# Altium PCB SCD2326控制板-V0.3.PcbDoc (part 1 of 2)
Units mil, origin at the board's own origin, x right, y up, seen from the top; angles counter-clockwise.
Board outline 4055.12 x 2086.61 mil, 2 copper layers (Top Layer, Bottom Layer), stack 12.8 mil thick; 202 components, 132 nets, 638 pads, 241 vias.
Unrouted connection lines stored in the file: 24.
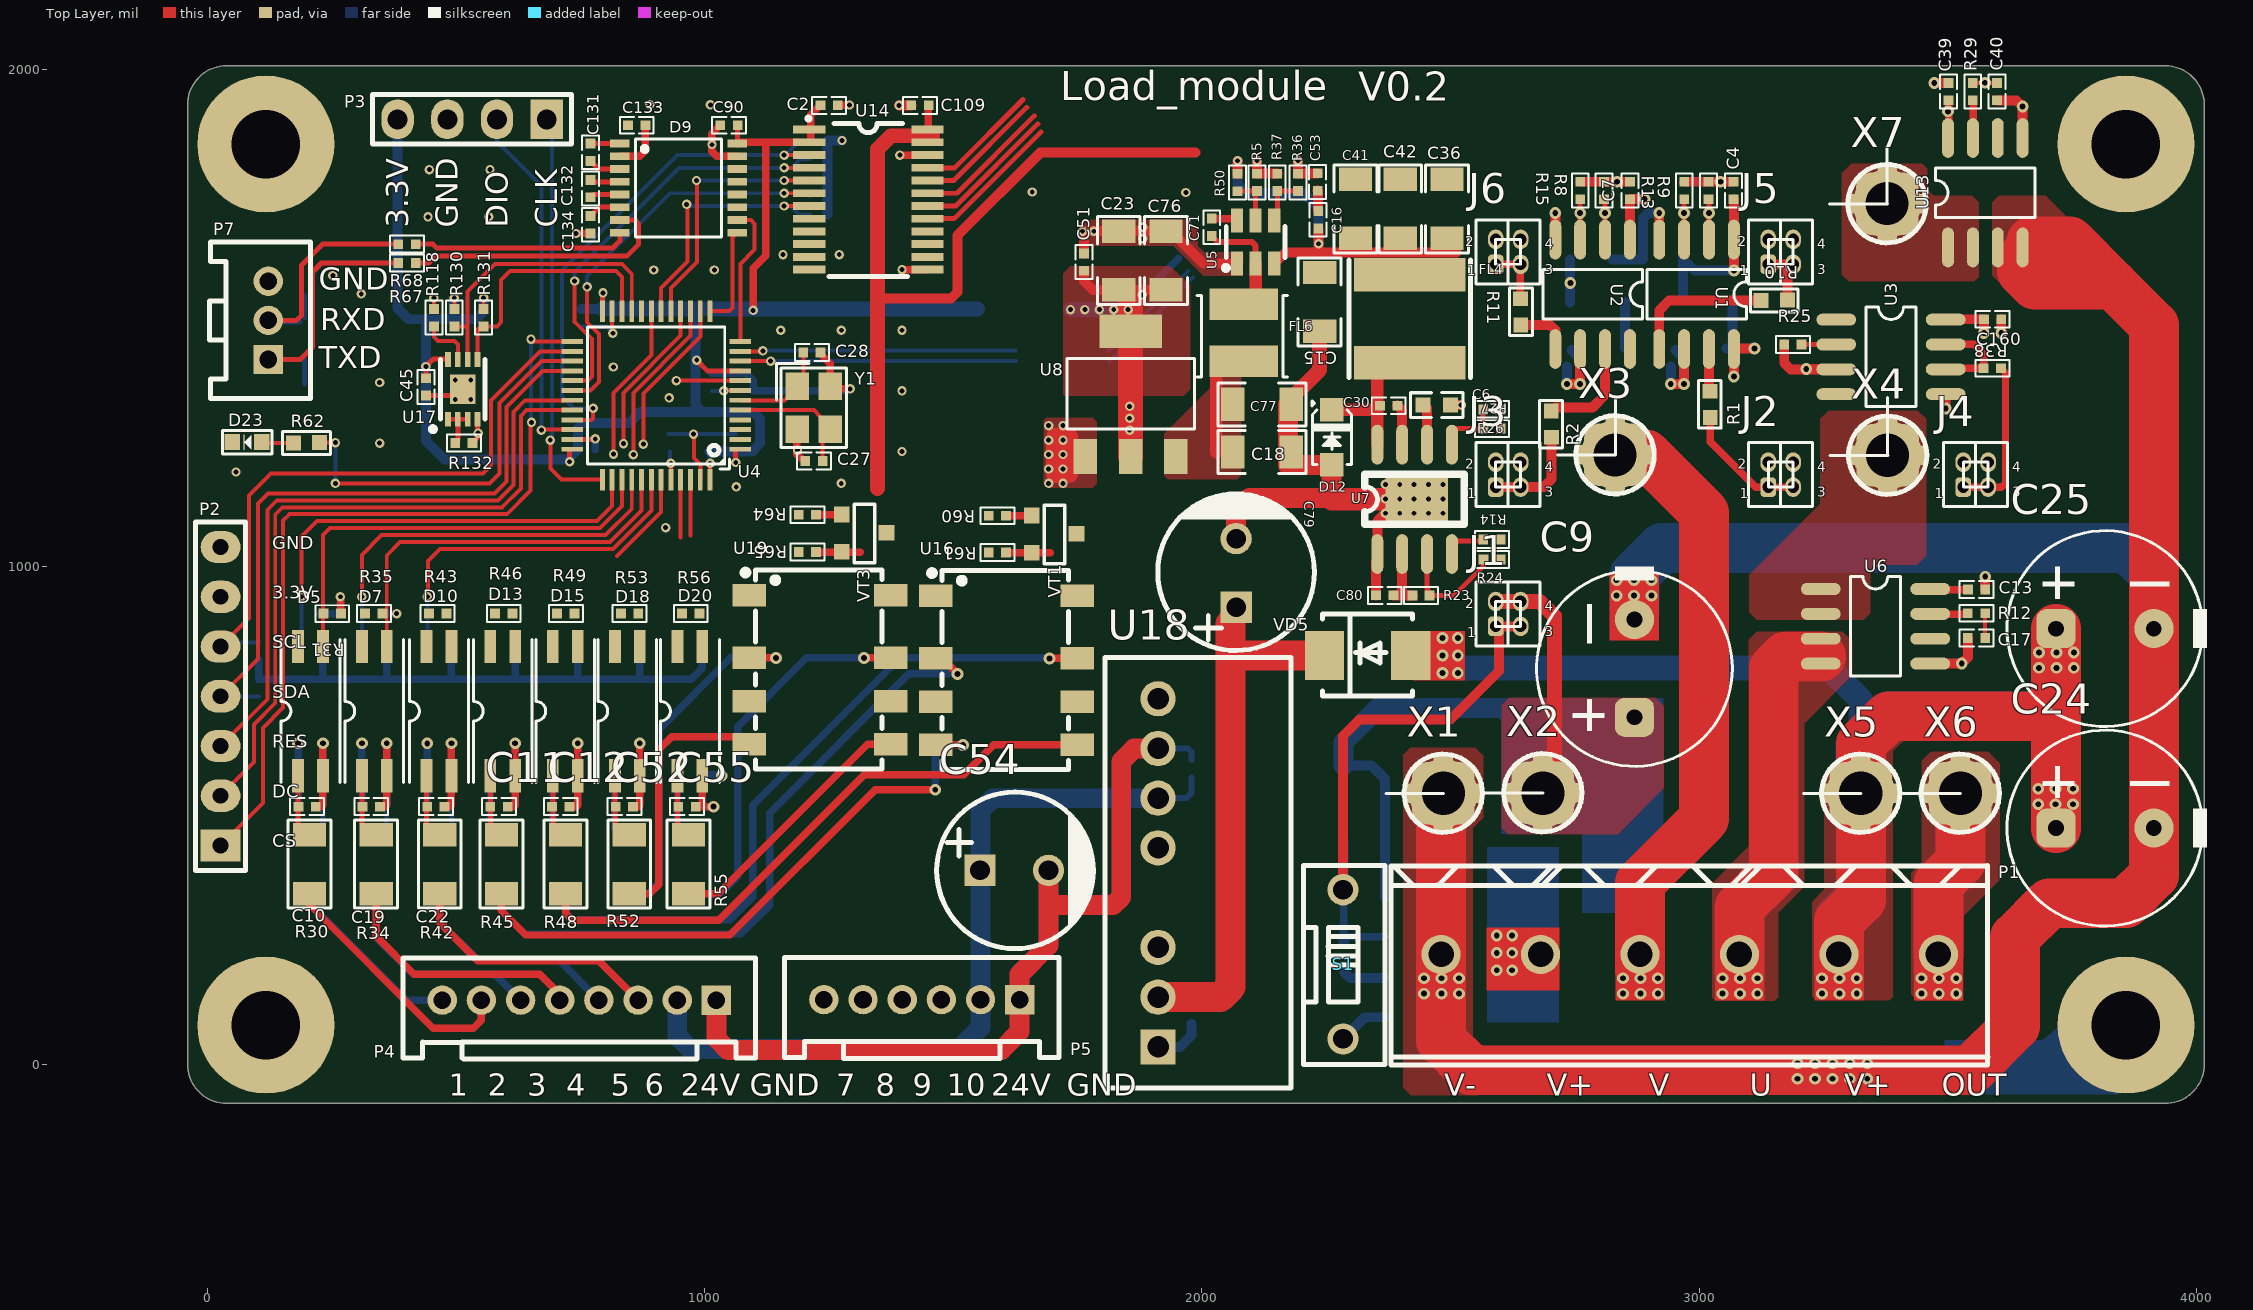
[diagram p0: Top Layer view]
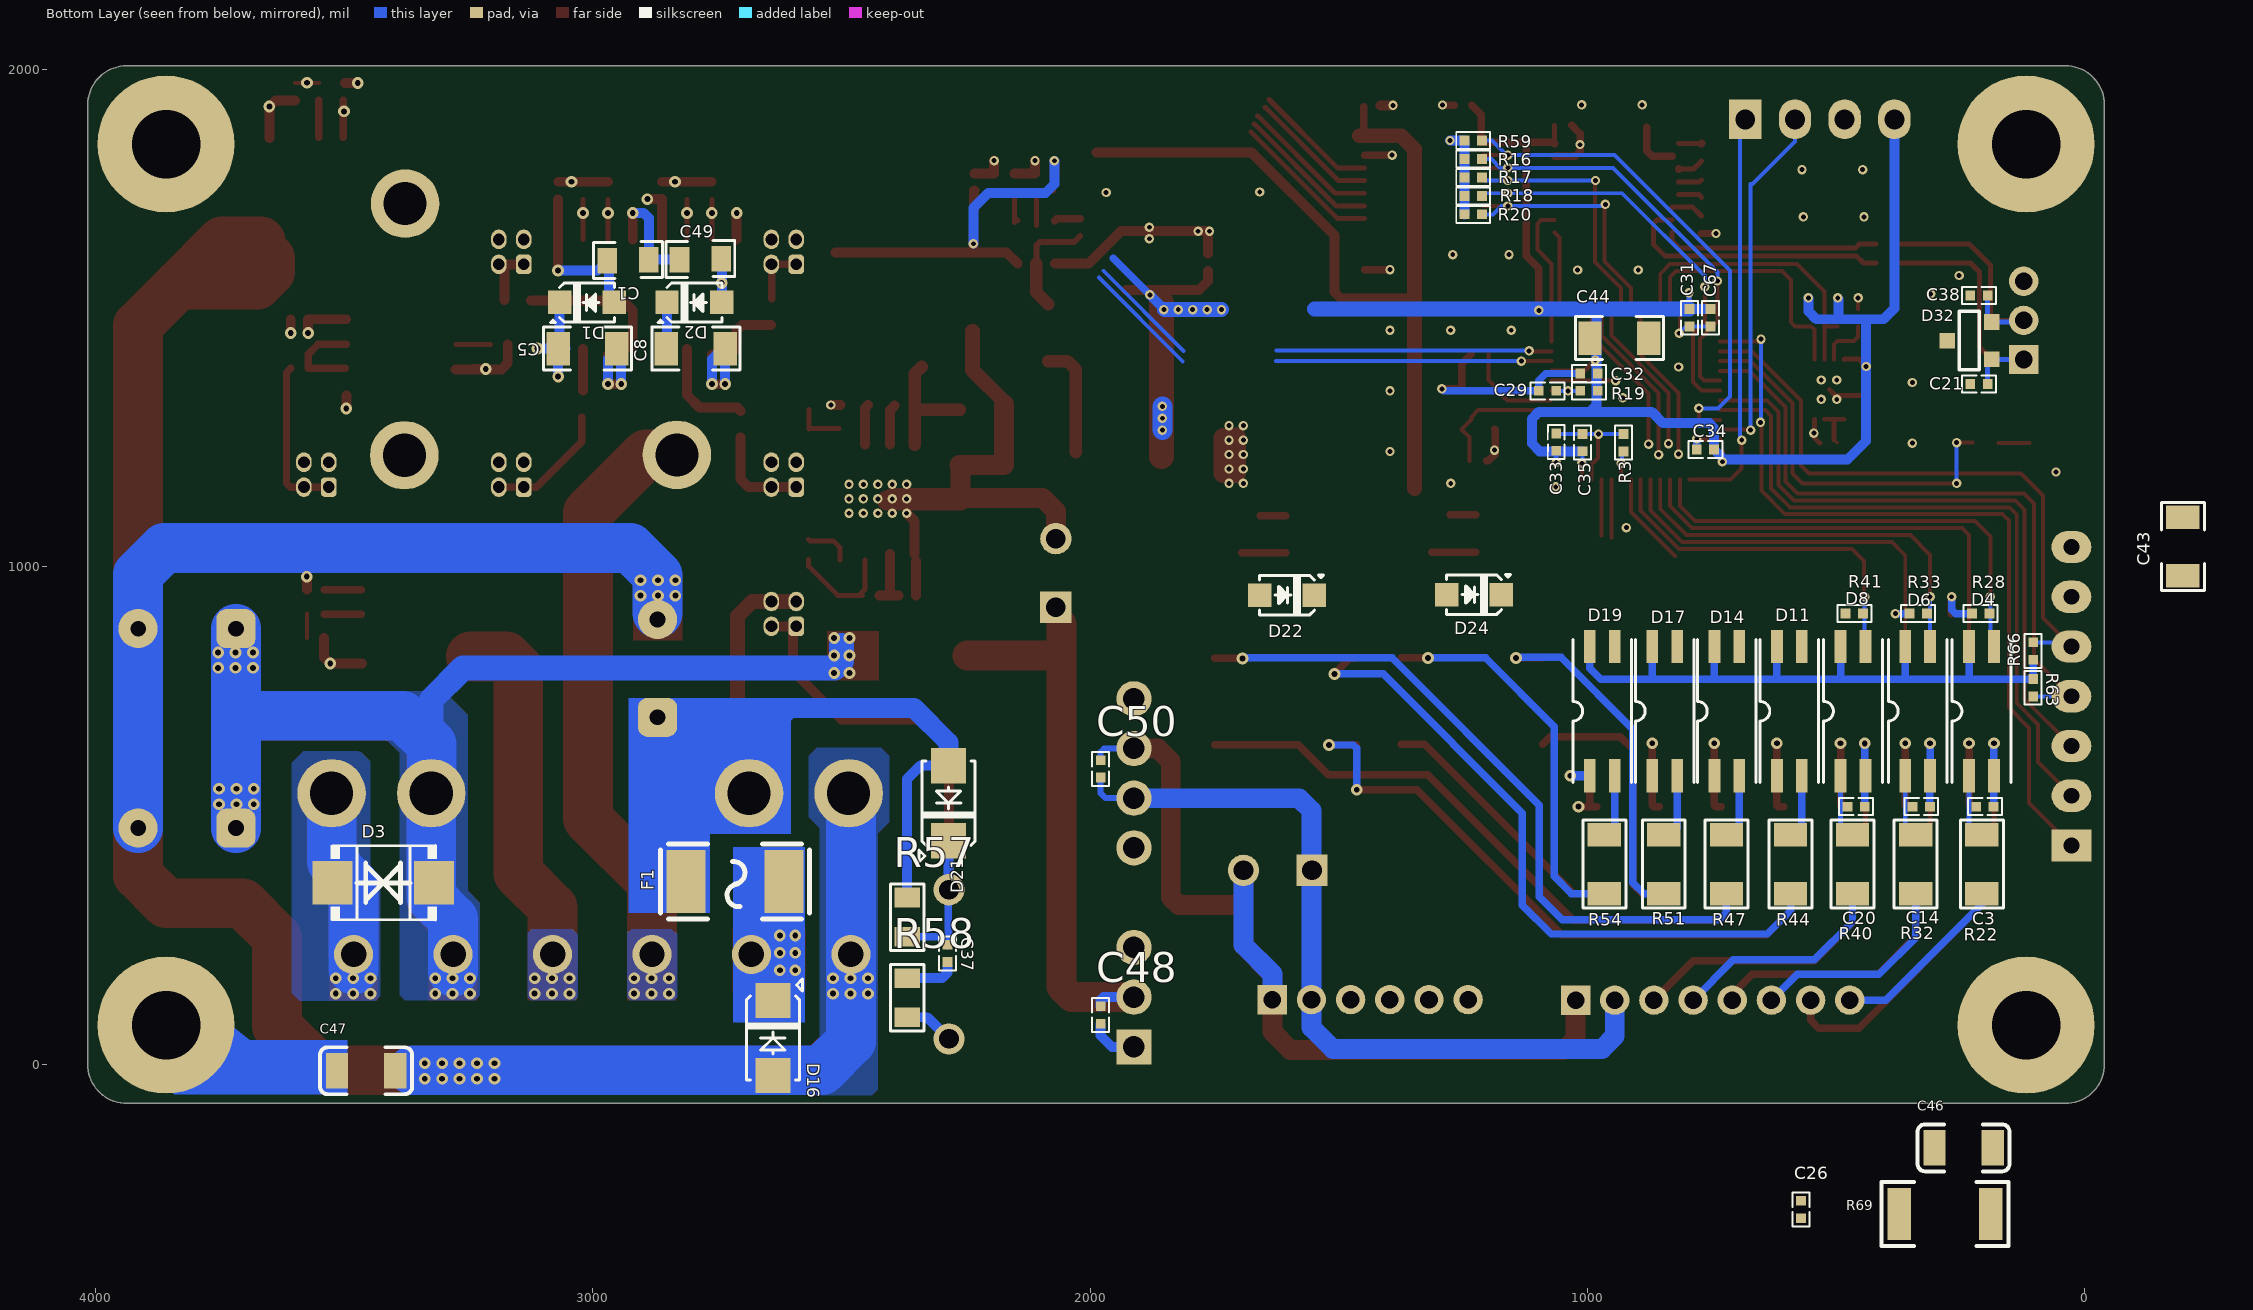
[diagram p1: Bottom Layer view, seen from below]
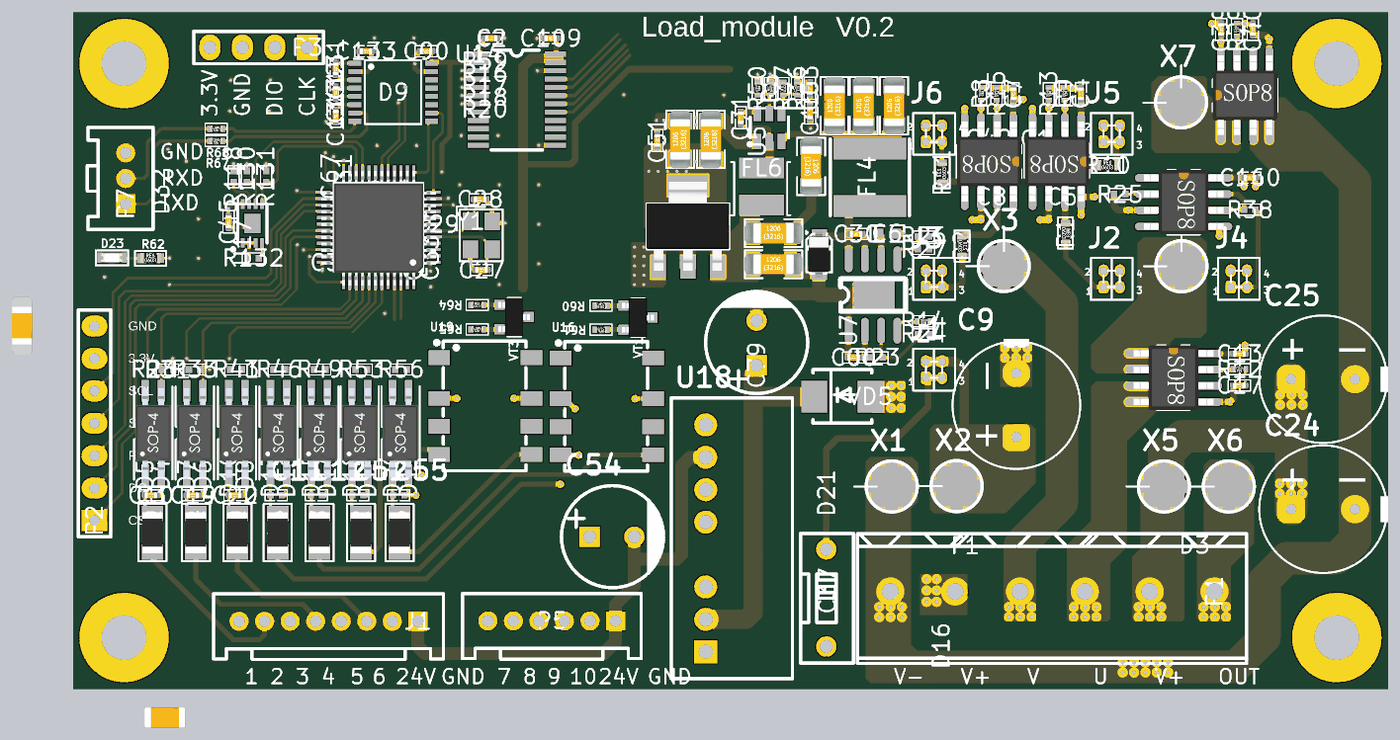
[diagram p3: 3D render of the assembled board from above, using the file's embedded part models]
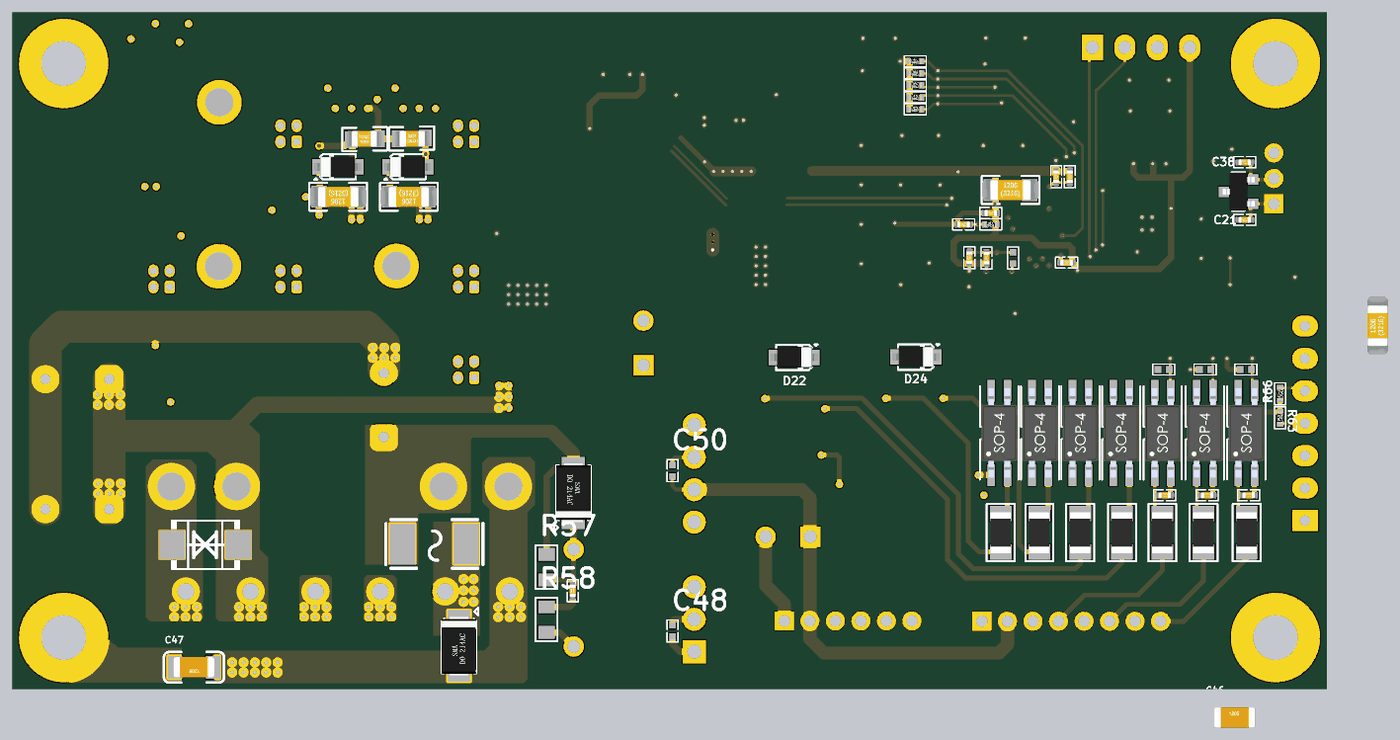
[diagram p4: 3D render of the assembled board from below, using the file's embedded part models]

## Layer stack, top to bottom
Top Solder: solder mask 0.4, Solder Resist, Dk 3.5
Top Layer: signal copper 1.4
Dielectric 1: core 10, PP-006, Dk 4.2
Bottom Layer: signal copper 1.4
Bottom Solder: solder mask 0.4, Solder Resist, Dk 3.5

## Board outline
-39.37,0 -39.37,1929.13 cw(c39.37,1929.13) 39.37,2007.87 3937.01,2007.87 cw(c3937.01,1929.13) 4015.75,1929.13 4015.75,0 cw(c3937.01,0) 3937.01,-78.74 39.37,-78.74 cw(c39.37,0)

## Design rules (kind name [scope] priority, off if disabled: settings)
Clearance [All] p1: gap=5.98
HoleSize [All] p1 off: absolutevalues=TRUE maxlimit=100 minlimit=1 maxpercent=80.000 minpercent=20.000
HoleToHoleClearance [All] p1 off: gap=10 allowstackedmicrovias=TRUE
LayerPairs [All] p1 off: enforce=TRUE
MinimumSolderMaskSliver [All] p1 off: minsoldermaskwidth=10
PlaneConnect [All] p1: planeconnectstyle=Direct reliefexpansion=20 reliefentries=4 reliefconductorwidth=10 reliefairgap=10
PolygonConnect [All] p1: connectstyle=Direct reliefconductorwidth=10 reliefentries=4 polygonreliefangle="90 Angle" airgapwidth=10
RoutingVias [All] p1: holewidth=28 width=50 viastyle="Through Hole" minholewidth=9.84 minwidth=17.72 maxholewidth=28 maxwidth=50
SilkToBoardRegionClearance [All] p1 off:
SilkToSilkClearance [All] p1 off: silktosilkclearance=10
SilkToSolderMaskClearance [IsPad] p1 off: minsilkscreentomaskgap=10 clearancetoexposedcopper=TRUE
SolderMaskExpansion [All] p1: expansion=4
Width [All] p1: maxlimit=100 minlimit=6 preferedwidth=10
21 further rules are at their usual default settings.

## Components (designator, comment, footprint, x,y, rotation, side; value= is the part's Value field where it differs from the comment)
C1 "2.2uF/25V/10%/0805/X7R" SC0805 2929,1617 r0 bottom
C2 "0.1uF/50V/10%/0402/X7R" SC0402 1250.54,1928.19 r0 top
C3 "0.1uF/50V/10%/0402/X7R" SC0402 201,517.99 r0 bottom
C4 "0.1uF/50V/10%/0402/X7R" SC0402 3069,1757 r270 top
C5 "10uF/25V/10%/1206/X7R" SC1206 3011,1439 r0 bottom
C6 "2.2uF/16V/10%/0603/X7R" SC0603 2471,1326 r0 top
C7 "0.1uF/50V/10%/0402/X7R" SC0402 2861,1757 r270 top
C8 "10uF/25V/10%/1206/X7R" SC1206 2793,1439 r0 bottom
C9 "470UF/50V/20%" D10 2870,796 r90 top
C10 "0.1uF/50V/10%/0402/X7R" SC0402 200.99,517.99 r180 top
C11 "0.1uF/50V/10%/0402/X7R" SC0402 587,518 r180 top
C12 "0.1uF/50V/10%/0402/X7R" SC0402 711,518 r180 top
C13 "0.1uF/50V/10%/0402/X7R" SC0402 3558,954.52 r180 top
C14 "0.1uF/50V/10%/0402/X7R" SC0402 329,518 r0 bottom
C15 "10uF/25V/10%/1206/X7R" SC1206 2237,1533 r270 top
C16 "0.1uF/50V/10%/0402/X7R" SC0402 2234,1698 r270 top
C17 "100pF/50V/10%/0402/X7R" SC0402 3557.7,856.86 r180 top
C18 "22uF/10V/10%/1206/X7R" SC1206 2121,1231 r0 top
C19 "0.1uF/50V/10%/0402/X7R" SC0402 330,518 r180 top
C20 "0.1uF/50V/10%/0402/X7R" SC0402 460,517.99 r0 bottom
C21 "100pF/50V/10%/0402/X7R" SC0402 213,1368 r0 bottom
C22 "0.1uF/50V/10%/0402/X7R" SC0402 459.99,517.99 r180 top
C23 "22uF/10V/10%/1206/X7R" SC1206 1832.98,1616 r90 top
C24 "470UF/50V/20%" D10 3816,475 r0 top
C25 "470UF/50V/20%" D10 3816,876 r0 top
C26 "0.1uF/50V/10%/0402/X7R" SC0402 571,-292 r90 bottom
C27 "12pF/50V/10%/0402/X7R" SC0402 1220.31,1213.26 r180 top
C28 "12pF/50V/10%/0402/X7R" SC0402 1216,1431 r0 top
C29 "0.1uF/50V/10%/0402/X7R" SC0402 1080.57,1354.08 r0 bottom
C30 "0.1uF/50V/10%/0402/X7R" SC0402 2375.73,1324.18 r180 top
C31 "0.1uF/50V/10%/0402/X7R" SC0402 795,1501 r270 bottom
C32 "0.1uF/50V/10%/0402/X7R" SC0402 997,1389 r0 bottom
C33 "0.1uF/50V/10%/0402/X7R" SC0402 1063,1251 r90 bottom
C34 "0.1uF/50V/10%/0402/X7R" SC0402 763,1236 r0 bottom
C35 "0.1uF/50V/10%/0402/X7R" SC0402 1010,1250 r90 bottom
C36 "10uF/25V/10%/1206/X7R" SC1206 2493,1720 r90 top
C37 "0.1uF/50V/10%/0402/X7R" SC0402 2287,223 r90 bottom
C38 "100pF/50V/10%/0402/X7R" SC0402 213,1546 r0 bottom
C39 "0.1uF/50V/10%/0402/X7R" SC0402 3501.54,1955.7 r270 top
C40 "100pF/50V/10%/0402/X7R" SC0402 3599.15,1955.7 r270 top
C41 "10uF/25V/10%/1206/X7R" SC1206 2309,1720 r90 top
C42 "10uF/25V/10%/1206/X7R" SC1206 2399,1720 r90 top
C43 "22uF/10V/10%/1206/X7R" SC1206 -197,1041 r90 bottom
C44 "22uF/10V/10%/1206/X7R" SC1206 936,1460 r180 bottom
C45 "0.1uF/50V/10%/0402/X7R" SC0402 440,1362 r270 top
C46 "1nF/2KV/10% X7R" 1206_C 244,-168 r180 bottom
C47 "1nF/2KV/10% X7R" 1206_C 3456,-13 r0 bottom
C48 "0.1uF/50V/10%/0402/X7R" SC0402 1979,99 r90 bottom
C49 "2.2uF/25V/10%/0805/X7R" SC0805 2784,1619 r180 bottom
C50 "0.1uF/50V/10%/0402/X7R" SC0402 1979,594 r270 bottom
C51 "0.1uF/50V/10%/0402/X7R" SC0402 1763,1613 r270 top
C52 "0.1uF/50V/10%/0402/X7R" SC0402 839,518 r180 top
C53 "0.1uF/50V/10%/0402/X7R" SC0402 2233,1774 r90 top
C54 "220UF/50V/20%" D8 1554,390 r0 top
C55 "0.1uF/50V/10%/0402/X7R" SC0402 965,518 r180 top
C67 "0.1uF/50V/10%/0402/X7R" SC0402 753,1501 r270 bottom
C71 "0.1uF/50V/10%/0402/X7R" SC0402 2020,1683 r270 top
C76 "22uF/10V/10%/1206/X7R" SC1206 1928,1616 r90 top
C77 "22uF/10V/10%/1206/X7R" SC1206 2121,1327 r0 top
C79 "220UF/50V/20%" D8 2069,919 r90 top
C80 "0.1uF/50V/10%/0402/X7R" SC0402 2368,943 r0 top
C90 "0.1uF/50V/10%/0402/X7R" SC0402 1049.43,1888.08 r180 top
C109 "0.1uF/50V/10%/0402/X7R" SC0402 1433.39,1928.19 r180 top
C131 "0.47uF/16V/10%/0402/X7R" SC0402 770.7,1833.7 r270 top
C132 "0.47uF/16V/10%/0402/X7R" SC0402 770.7,1760.7 r270 top
C133 "0.47uF/16V/10%/0402/X7R" SC0402 863.7,1888.08 r180 top
C134 "0.47uF/16V/10%/0402/X7R" SC0402 771,1688 r270 top
C160 "0.1uF/50V/10%/0402/X7R" SC0402 3590,1498 r180 top
D1 "E1D" SOD123 3013,1531 r0 bottom
D2 "E1D" SOD123 2797,1531 r0 bottom
D3 "SS56B" DO-214AA 3419,364 r180 bottom
D4 "EL3H4(A)(TA)-G" SOP-4 233,580.74 r90 bottom
D5 "EL3H4(A)(TA)-G" SOP-4 182.62,580.74 r90 top
D6 "EL3H4(A)(TA)-G" SOP-4 361.38,580.74 r90 bottom
D7 "EL3H4(A)(TA)-G" SOP-4 311,580.74 r90 top
D8 "EL3H4(A)(TA)-G" SOP-4 491.38,580.74 r90 bottom
D9 "TPT3232E-TS3R" TSSOP16 947.89,1761.68 r0 top
D10 "EL3H4(A)(TA)-G" SOP-4 441,580.74 r90 top
D11 "EL3H4(A)(TA)-G" SOP-4 619.38,580.74 r90 bottom
D12 "E1D" SOD123 2261,1262 r90 top
D13 "EL3H4(A)(TA)-G" SOP-4 569.19,580.74 r90 top
D14 "EL3H4(A)(TA)-G" SOP-4 745.15,580.74 r90 bottom
D15 "EL3H4(A)(TA)-G" SOP-4 694.97,580.74 r90 top
D16 "SMAJ33CA" DO-214AC 2638,53 r90 bottom
D17 "EL3H4(A)(TA)-G" SOP-4 869.93,580.74 r90 bottom
D18 "EL3H4(A)(TA)-G" SOP-4 819.74,580.74 r90 top
D19 "EL3H4(A)(TA)-G" SOP-4 995.71,580.74 r90 bottom
D20 "EL3H4(A)(TA)-G" SOP-4 945.52,580.74 r90 top
D21 "SMAJ12CA" DO-214AC 2285,525 r270 bottom
D22 "E1D" SOD123 1603,944 r180 bottom
D23 "绿色LED/0603" LED0603 79.74,1250.61 r180 top
D24 "E1D" SOD123 1227,945 r180 bottom
D32 "SMC12" SOT-23 232,1455 r90 bottom
F1 "2410BP-20A" SMD2410 2712,362 r180 bottom
FL4 "NRSE6028-680M" SMD6*6 2410,1501 r90 top
FL6 "MWSA0402S-4R7MT" SMD4*4 2084,1528 r0 top
J1 "1.27mm 2*2P贴片排针(NC)" CON_1D27_2X2 2616,905.52 r0 top
J2 "1.27mm 2*2P贴片排针(NC)" CON_1D27_2X2 3164,1185.52 r0 top
J3 "1.27mm 2*2P贴片排针(NC)" CON_1D27_2X2 2616,1185.52 r0 top
J4 "1.27mm 2*2P贴片排针(NC)" CON_1D27_2X2 3556,1185.52 r0 top
J5 "1.27mm 2*2P贴片排针(NC)" CON_1D27_2X2 3164,1633.52 r0 top
J6 "1.27mm 2*2P贴片排针(NC)" CON_1D27_2X2 2616,1633.52 r0 top
P1 "5.08mm接线端子6p" CON_5.08_6P 3481,221 r270 top
P2 "SIP7" SIP7 27,440 r90 top
P3 "2.54排针单排4P" SIP4 683,1900 r180 top
P4 "HC-HY-8A-M" HC-HY-8A-M 1024,129 r180 top (schematic designator J1)
P5 "HC-HY-6A-M" HC-HY-6A-M 1437,130 r180 top
P7 "HC-HY-3A-M" HC-HY-3A-M 123,1417 r90 top
R1 "10R/1%/0603" SR0603 3022,1327 r270 top
R2 "10R/1%/0603" SR0603 2703,1287 r270 top
R3 "4.7K/1%/0402" SR0402#1 929,1249.62 r90 bottom
R5 "10K/1%/0402" SR0402#2 2110.95,1773.27 r90 top
R8 "10K/1%/0402" SR0402#2 2761,1757 r270 top
R9 "10K/1%/0402" SR0402#2 3019,1757 r270 top
R10 "10R/1%/0603" SR0603 3151,1536 r0 top
R11 "10R/1%/0603" SR0603 2641,1513 r90 top
R12 "100R/1%/0402" SR0402#2 3557.7,906.86 r180 top
R13 "10K/1%/0402" SR0402#2 2970,1757 r270 top
R14 "0R" SR0402#2 2583.62,1055 r180 top
R15 "10K/1%/0402" SR0402#2 2809,1757 r270 top
R16 "10K/1%/0402" SR0402#2 1230,1820 r180 bottom
R17 "10K/1%/0402" SR0402#2 1230,1783 r180 bottom
R18 "10K/1%/0402" SR0402#2 1230,1746 r180 bottom
R19 "4.7K/1%/0402" SR0402#2 997,1354.08 r180 bottom
R20 "10K/1%/0402" SR0402#2 1230,1709 r180 bottom
R22 "3.3K/5%/1206" SR1206 208,402 r270 bottom
R23 "20K/1%/0402" SR0402#1 2440.35,943.8 r0 top
R24 "3.3K/1%/0402" SR0402#1 2583.24,1016 r0 top
R25 "10K/1%/0402" SR0402#1 3189,1446.52 r180 top
R26 "20K/1%/0402" SR0402#1 2583,1318 r0 top
R27 "2.2K/1%/0402" SR0402#1 2584,1277 r180 top
R28 "3.3K/1%/0402" SR0402#1 210,907 r180 bottom
R29 "100R/1%/0402" SR0402#2 3550.15,1955.7 r270 top
R30 "3.3K/5%/1206" SR1206 205,402 r270 top
R31 "3.3K/1%/0402" SR0402#1 252,905 r180 top
R32 "3.3K/5%/1206" SR1206 341,402 r270 bottom
R33 "3.3K/1%/0402" SR0402#1 335.76,907 r180 bottom
R34 "3.3K/5%/1206" SR1206 339,402 r270 top
R35 "3.3K/1%/0402" SR0402#1 335,907 r0 top
R36 "53.6K/1%/0402" SR0402#2 2193.25,1773.28 r270 top
R37 "10K/1%/0402" SR0402#2 2151.78,1773.28 r90 top
R38 "33R/1%/0402" SR0402#1 3590,1398.52 r180 top
R40 "3.3K/5%/1206" SR1206 468,402 r270 bottom
R41 "3.3K/1%/0402" SR0402#1 463.76,907 r180 bottom
R42 "3.3K/5%/1206" SR1206 467,402 r270 top
R43 "3.3K/1%/0402" SR0402#1 463,907 r0 top
R44 "3.3K/5%/1206" SR1206 592.58,402 r270 bottom
R45 "3.3K/5%/1206" SR1206 591,402 r270 top
R46 "3.3K/1%/0402" SR0402#1 596,907 r0 top
R47 "3.3K/5%/1206" SR1206 721.58,402 r270 bottom
R48 "3.3K/5%/1206" SR1206 720,402 r270 top
R49 "3.3K/1%/0402" SR0402#1 721,907 r0 top
R50 "12K/1%/0402" SR0402#2 2072,1773 r270 top
R51 "3.3K/5%/1206" SR1206 847.58,402 r270 bottom
R52 "3.3K/5%/1206" SR1206 848,402 r270 top
R53 "3.3K/1%/0402" SR0402#1 849,907 r0 top
R54 "3.3K/5%/1206" SR1206 967,402 r270 bottom
R55 "3.3K/5%/1206" SR1206 967,402 r270 top
R56 "3.3K/1%/0402" SR0402#1 972,907 r0 top
R57 "3K/1%/0805" SR0805 2368,296 r90 bottom
R58 "3K/1%/0805" SR0805 2368,134 r90 bottom
R59 "10K/1%/0402" SR0402#2 1230,1857.39 r180 bottom
R60 "3.3K/1%/0402" SR0402#2 1589,1103 r0 top
R61 "10K/1%/0402" SR0402#2 1589,1029 r180 top
R62 "1K/1%/0603" SR0603 199.74,1249.61 r0 top
R63 "10K/1%/0402" SR0402#2 104,757 r90 bottom
R64 "3.3K/1%/0402" SR0402#2 1207,1105 r0 top
R65 "10K/1%/0402" SR0402#2 1207,1030 r180 top
R66 "10K/1%/0402" SR0402#2 104,831 r270 bottom
R67 "100R/1%/0402" SR0402#2 402,1611 r180 top
R68 "100R/1%/0402" SR0402#2 402,1649 r180 top
R69 "1M 1% 2KV 2010" 2010_R 281,-301 r180 bottom
R118 "4.7K/1%/0402" SR0402#1 455,1501 r90 top
R130 "4.7K/1%/0402" SR0402#1 496,1501 r90 top
R131 "4.7K/1%/0402" SR0402#1 555,1501 r90 top
R132 "4.7K/1%/0402" SR0402#1 516,1250 r0 top
S1 "DSWB01LHGET开关" SW-TH_DSWB01LHGET 2284,201 r0 top
U1 "EG3112" SO-8 2995,1548 r270 top
U2 "EG3112" SO-8 2786,1548 r270 top
U3 "EG3001" SO-8 3386,1422.52 r0 top
U4 "STM32F103CBT6" LQFP-48 903,1345 r180 top
U5 "BL8032CB6TR" TSOT23-6L 2070.84,1609.93 r90 top
U6 "CC6920SO-50A" SO-8 3354.7,880.86 r0 top
U7 "SCT2A23ASTER" SOIC_8_EP 2352.92,1026.02 r90 top
U8 "ME1117A33B3G" SOT-223 1857,1348 r0 top
U13 "CC6920SO-50A" SO-8 3575.25,1752.7 r90 top
U14 "RS8T245YTSS24" TSSOP-24 1210.4,1879.37 r0 top
U16 "G6K-2F-Y-5V_C2982926" SMD-8_L10.0-W6.5 1465,942 r270 top
U17 "BL24C128A-NTRC" UDFN-8 484,1297 r90 top
U18 "VRB2424S-10WR3" VRBXXXXS-10WR3 1912,35 r90 top
U19 "G6K-2F-Y-5V_C2982926" SMD-8_L10.0-W6.5 1090,943 r270 top
VD5 "SS56B" SMB 2419,823 r180 top
VT1 "S8050" SOT-23 1703,1066 r270 top
VT3 "S8050" SOT-23 1321,1068 r270 top
X1 "底直径3身直径2总长6.5mm铜镀金实心导电车件铜柱" CON_3D0_1TP 2485.63,545 r180 top
X2 "底直径3身直径2总长6.5mm铜镀金实心导电车件铜柱" CON_3D0_1TP 2685.73,546 r180 top
X3 "底直径3身直径2总长6.5mm铜镀金实心导电车件铜柱" CON_3D0_1TP 2831,1225.52 r180 top
X4 "底直径3身直径2总长6.5mm铜镀金实心导电车件铜柱" CON_3D0_1TP 3379.11,1224.63 r180 top
X5 "底直径3身直径2总长6.5mm铜镀金实心导电车件铜柱" CON_3D0_1TP 3325,545 r180 top
X6 "底直径3身直径2总长6.5mm铜镀金实心导电车件铜柱" CON_3D0_1TP 3525.1,545 r180 top
X7 "底直径3身直径2总长6.5mm铜镀金实心导电车件铜柱" CON_3D0_1TP 3378,1730.52 r0 top
Y1 "X32258MSB4SI  8MHz" SMD3225-4P 1186.31,1363.26 r0 top

## Footprints (in the part's own frame and the unit in brackets; to place one, negate y for a bottom-side part, rotate by r counter-clockwise, add the part's x,y. Pads: shape width x height; smd on the part's side, far side on the other; paste and mask are expansions set on the pad)
1206_C [mm]
  rect 1.13x1.8 smd: 1(-1.49,0) 2(1.49,0)
  silkscreen extent -2.36,-1.2 2.35,1.2, body extent -1.6,-0.81 1.6,0.79, height 1
2010_R [mm]
  rect 1.2x2.67 smd: 1(-2.34,0) 2(2.34,0)
  silkscreen extent -3.24,-1.64 3.24,1.64, body extent -2.5,-1.25 2.5,1.25, height 0.6
CON_1D27_2X2 [mm]
  rrect50% 0.8x1 hole 0.6: 1(-0.635,-0.635)
  oval 0.8x1 hole 0.6: 2(-0.635,0.635) 3(0.635,-0.635) 4(0.635,0.635)
  silkscreen extent -1.64,-1.64 1.64,1.64
CON_3D0_1TP [mm]
  rrect50% 4x1 smd: 1(-0.01,0)
  rrect50% 3.2x3.2 smd: 1(0,0)
  rrect50% 1x4 smd: 1(0,-0.02)
  silkscreen extent -2,-2 2,2
CON_5.08_6P [mm]
  round 2 hole 1.3: 1(0.003,0.003) 2(0.003,-5.077) 3(0.003,-10.157) 4(0.003,-15.237) 5(0.003,-20.317) 6(0.003,-25.397)
  silkscreen extent -4.53,-27.96 5.64,2.53
D8 [mm]
  rect 1.6x1.6 hole 1: 1(0,0)
  round 1.6 hole 1: 2(3.5,0)
  silkscreen extent -2.21,-4 5.79,4
D10 [mm]
  rrect50% 2x2 hole 0.8: 1(-2.5,0)
  round 2 hole 0.8: 2(2.5,0)
  silkscreen extent -5,-5 5.21,5
DO-214AA [mil]
  rect 80.61x88.23 smd paste+0 mask+2: 1(-104.7,1.06) 2(99.34,1.06)
  silkscreen extent -108,-74 105,76
DO-214AC [mm]
  rect 1.8x1.8 smd: 1(-1.915,0) 2(1.915,0)
  silkscreen extent -2.15,-1.5 3,1.35, body extent -2.32,-1.34 2.28,1.36, height 2.4
HC-HY-3A-M [mm]
  rect 1.5x1.5 hole 0.9 paste+0 mask+0.05: 1(0,0)
  round 1.5 hole 0.9 paste+0 mask+0.05: 2(2,0) 3(4,0)
  silkscreen extent -2,-2.15 6,3
HC-HY-6A-M [mm] "华灿天禄"
  rect 1.5x1.5 hole 0.9 paste+0 mask+0.05: 1(-5,0)
  round 1.5 hole 0.9 paste+0 mask+0.05: 2(-3,0) 3(-1,0) 4(1,0) 5(3,0) 6(5,0)
  silkscreen extent -7,-2.15 7,3
HC-HY-8A-M [mm]
  rect 1.5x1.5 hole 0.9 paste+0 mask+0.05: 1(0,0)
  round 1.5 hole 0.9 paste+0 mask+0.05: 2(2,0) 3(4,0) 4(6,0) 5(8,0) 6(10,0) 7(12,0) 8(14,0)
  silkscreen extent -2,-2.15 16,3
LED0603 [mm]
  rect 0.8x0.8 smd: 1(-0.761,-0.013) 2(0.736,-0.013)
  silkscreen extent -1.3,-0.6 1.25,0.6, body extent -0.81,-0.41 0.81,0.39, height 0.6
LQFP-48 [mm]
  rect 1.1x0.25 smd: 1(-4.3,2.75) 2(-4.3,2.25) 3(-4.3,1.75) 4(-4.3,1.25) 5(-4.3,0.75) 6(-4.3,0.25) 7(-4.3,-0.25) 8(-4.3,-0.75) 9(-4.3,-1.25) 10(-4.3,-1.75) 11(-4.3,-2.25) 12(-4.3,-2.75) 25(4.3,-2.75) 26(4.3,-2.25) 27(4.3,-1.75) 28(4.3,-1.25) 29(4.3,-0.75) 30(4.3,-0.25) 31(4.3,0.25) 32(4.3,0.75) 33(4.3,1.25) 34(4.3,1.75) 35(4.3,2.25) 36(4.3,2.75)
  rect 0.25x1.1 smd: 13(-2.75,-4.3) 14(-2.25,-4.3) 15(-1.75,-4.3) 16(-1.25,-4.3) 17(-0.75,-4.3) 18(-0.25,-4.3) 19(0.25,-4.3) 20(0.75,-4.3) 21(1.25,-4.3) 22(1.75,-4.3) 23(2.25,-4.3) 24(2.75,-4.3) 37(2.75,4.3) 38(2.25,4.3) 39(1.75,4.3) 40(1.25,4.3) 41(0.75,4.3) 42(0.25,4.3) 43(-0.25,4.3) 44(-0.75,4.3) 45(-1.25,4.3) 46(-1.75,4.3) 47(-2.25,4.3) 48(-2.75,4.3)
  silkscreen extent -3.75,-3.5 3.5,3.75, body extent -4.5,-4.44 4.5,4.56, height 1.56
SC0402 [mm]
  rect 0.5x0.5 smd: 1(-0.444,0) 2(0.444,0)
  silkscreen extent -0.86,-0.43 0.86,0.43, body extent -0.73,-0.25 0.73,0.25, height 0.51
SC0603 [mil]
  rect 30x30 smd: 1(28.74,-0.39) 2(-26.26,-0.39)
  silkscreen extent -51,-25 54,25
SC0805 [mm]
  rect 1x1.3 smd: 1(-1.061,-0.026) 2(1.061,0.026)
  silkscreen extent -1.76,-0.94 1.76,0.94, body extent -1.36,-0.65 1.44,0.6, height 0.8
SC1206 [mm]
  rect 1.2x1.7 smd: 1(-1.5,0) 2(1.5,0)
  silkscreen extent -2.25,-1.1 2.25,1.1, body extent -2.27,-0.8 2.27,0.8, height 1.25
SIP4 [mil]
  rect 65x80 hole 40: 1(0,0)
  oval 65x80 hole 40: 2(100,0) 3(200,0) 4(300,0)
  silkscreen extent -50,-50 350,50
SIP7 [mil]
  rect 65x80 hole 32: 1(0,0)
  oval 65x80 hole 32: 2(100,0) 3(200,0) 4(300,0) 5(400,0) 6(500,0) 7(600,0)
  silkscreen extent -50,-50 650,50
SMB [mm]
  rect 2x2.5 smd: 1(-0.025,0.025) 2(4.375,0.025)
  silkscreen extent -0.13,-2.1 4.47,2.1
SMD4*4 [mm]
  rect 3.5x1.6 smd: 1(0,0) 2(0,-2.9)
  silkscreen extent -2.37,-3.7 2.25,0.45
SMD6*6 [mm]
  rect 1.7x5.7 smd: 1(-2.298,-0.202) 2(2.202,-0.202)
  silkscreen extent -3.05,-3.3 2.95,2.9
SMD2410 [mm]
  rect 2x3.2 smd: 1(-2.553,0.14) 2(2.447,0.14)
  silkscreen extent -3.86,-1.77 3.76,2.04
SMD3225-4P [mm]
  rect 1.2x1.4 smd: 1(0,0) 2(0,-2.2) 3(1.7,-2.2) 4(1.7,0)
  silkscreen extent -1.06,-3.13 2.53,1.16
SMD-8_L10.0-W6.5 [mm]
  rect 1.15x1.7 smd: 1(0,0) 2(3.2,0) 3(5.4,0) 4(7.6,0) 5(7.6,7.235) 6(5.4,7.235) 7(3.2,7.235) 8(0,7.235)
  silkscreen extent -1.31,-0.34 8.88,6.79
SO-8 [mil]
  oval 80x24 smd: 1(-110.24,74.8) 2(-110.24,24.8) 3(-110.24,-25.2) 4(-110.24,-75.2) 5(109.76,-75.2) 6(109.76,-25.2) 7(109.76,24.8) 8(109.76,74.8)
  silkscreen extent -50,-100 50,100, body extent -123,-99 123,99, height 69
SOD123 [mm]
  rect 1.2x1.2 smd: 1(-1.43,-0.02) 2(1.37,-0.02)
  silkscreen extent -1.43,-1.02 1.83,1, body extent -1.85,-0.8 1.85,0.8, height 1.27
SOIC_8_EP [mil]
  oval 80x24 smd: 1(0,0) 2(0,-50) 3(0,-100) 4(0,-150) 5(220,-150) 6(220,-100) 7(220,-50) 8(220,0)
  rect 102.36x125.98 smd: 9(110,-79.06)
  silkscreen extent 60,-175 160,25
SOP-4 [mm]
  rect 1.7x0.6 smd: 1(-0.015,-0.005) 2(-0.015,-1.275) 3(6.585,-1.275) 4(6.585,-0.005)
  silkscreen extent -0.36,-2.14 6.94,0.86, body extent -0.21,-2.04 6.79,0.76, height 2.1
SOT-23 [mil]
  rect 31.5x31.5 smd: 1(-37.5,-45) 2(37.5,-45) 3(-0.5,45)
  silkscreen extent -58,-20 60,21, body extent -59,-49 59,49, height 43
SOT-223 [mm]
  rect 1.2x1.8 smd: 1(-2.31,-3.2) 2(0,-3.2) 3(2.31,-3.2)
  rect 3.2x1.7 smd: 4(0,3.2)
  silkscreen extent -3.25,-1.8 3.25,1.8, body extent -3.25,-3.48 3.25,3.48, height 1.7
SR0402#1 [mil]
  rect 20x20 smd: 1(-17.12,-0.98) 2(17.88,-0.98)
  silkscreen extent -34,-18 34,16
SR0402#2 [mil]
  rect 19.68x19.68 smd: 1(-17.5,0) 2(17.5,0)
  silkscreen extent -34,-17 34,17, body extent -20,-10 20,10, height 14
SR0603 [mil]
  rect 30x30 smd: 1(-26.26,-0.39) 2(26.26,0.39)
  silkscreen extent -48,-24 48,22, body extent -31,-15 32,16, height 18
SR0805 [mm]
  rect 1x1.3 smd: 1(-1,0) 2(1,0)
  silkscreen extent -1.7,-0.86 1.7,0.86
SR1206 [mm] "Chip Resistor; Body 3.2x1.6mm"
  rect 1.2x1.7 smd: 1(-1.51,0.02) 2(1.49,0.02)
  silkscreen extent -2.26,-1.08 2.24,1.12, body extent -1.6,-0.79 1.6,0.81, height 0.6
SW-TH_DSWB01LHGET [mm] "Connector; Header; 2 Position"
  round 1.6 hole 1: 1(0,3.81) 2(0,-3.81)
  silkscreen extent -2.02,-5.11 2.13,5.05
TSOT23-6L [mil]
  rect 48x24.5 smd: 1(0,0) 3(0,-74.8) 6(86.61,0)
  rect 48x24.45 smd: 2(0,-37.4)
  rect 48x24.4 smd: 4(86.61,-74.8)
  rect 48x24.55 smd: 5(86.61,-37.4)
  silkscreen extent -14,-96 75,28
TSSOP16 [mm]
  rect 1x0.4 smd: 1(-3,2.275) 2(-3,1.625) 3(-3,0.975) 4(-3,0.325) 5(-3,-0.325) 6(-3,-0.975) 7(-3,-1.625) 8(-3,-2.275) 9(3,-2.275) 10(3,-1.625) 11(3,-0.975) 12(3,-0.325) 13(3,0.325) 14(3,0.975) 15(3,1.625) 16(3,2.275)
  silkscreen extent -2.2,-2.5 2.2,2.5
TSSOP-24 [mm]
  rect 1.65x0.4 smd: 1(0,0) 2(0,-0.65) 3(0,-1.3) 4(0,-1.95) 5(0,-2.6) 6(0,-3.25) 7(0,-3.9) 8(0,-4.55) 9(0,-5.2) 10(0,-5.85) 11(0,-6.5) 12(0,-7.15) 13(6.045,-7.15) 14(6.045,-6.5) 15(6.045,-5.85) 16(6.045,-5.2) 17(6.045,-4.55) 18(6.045,-3.9) 19(6.045,-3.25) 20(6.045,-2.6) 21(6.045,-1.95) 22(6.045,-1.3) 23(6.045,-0.65) 24(6.045,0)
  silkscreen extent -0.13,-7.51 5.03,0.67
UDFN-8 [mil]
  rect 29.52x11.81 smd: 1(0,0) 2(0,-20) 3(0,-40) 4(0,-60) 5(120,-60) 6(120,-40) 7(120,-20) 8(120,0)
  rect 59.06x51.18 smd: 9(60,-29.99)
  silkscreen extent -25,-75 120,35
VRBXXXXS-10WR3 [mm]
  rect 1.8x1.8 hole 1.1: 1(0,0)
  round 1.8 hole 1.1: 2(2.54,0) 3(5.08,0) 5(10.16,0) 6(12.7,0) 7(15.24,0) 8(17.78,0)
  silkscreen extent -2.11,-6.8 19.89,2.7

## Part data
C1 C5 C8: library part CAP, "GRT188C81E475ME13D  X5R/0603"
C2 C3 C10 C11 C12 C13 C14 C15 C16 C17 C19 C20 C21 C22 C29 C31 C32 C33 C34 C35 C38 C39 C40 C51 C52 C53 C55 C67 C71 C90 C109 C131 C132 C133 C134 C160: library part Cap_0
C4 C7 C49: library part CAP, "X7R/0402"
C6 C26 C30 C37 C45 C46 C47 C48 C50 C80: library part CAP, "Capacitor"
C9 C24 C25 C54 C79: library part "CAP POL_0"
C18 C23 C36 C41 C42 C43 C44 C76 C77: library part C, "CL31A226KAHNNNE  三星或TDK"
C27 C28: library part CAP, "无极性电容"
D1 D2 D22 D24: library part Diode, "YANGJIE"
D3 D12 VD5: library part DIODE, "Diode"
D4 D5 D6 D7 D8 D10 D11 D13 D14 D15 D17 D18 D19 D20: library part TLP, "光耦  TLP280[GR-TP,F,T] (TOSHIBA)"
D9: library part MAX3232
D16 D21: library part TVS
D23: library part LED, "红色LED"
D32: library part TVS2
F1: library part JFC2410-2150TS
FL4 FL6: library part BLM21, "电感 SRR4828A-470M  BOURNS"
J1 J2 J3 J4 J5 J6: library part "HEADER 2X2"
P1 P5: library part CON6, "Connector"
P2: library part CON7, "Connector"
P3: library part CON4, "Connector"
P4: library part CON8, "Connector"
P7: library part CON3, "Connector"
R1 R2 R8 R9 R10 R11 R13 R15 R57 R58: library part RES2, "X7R/0603"
R3 R5 R12 R16 R17 R18 R19 R20 R26 R27 R28 R29 R31 R33 R35 R36 R37 R41 R43 R46 R49 R50 R53 R56 R59 R60 R61 R62 R64 R65 R118 R130 R131 R132: library part RES2
R14 R23 R24: library part Res1_2
R22 R30 R32 R34 R40 R42 R44 R45 R47 R48 R51 R52 R54 R55: library part RES, "贴片电阻  RC1210FR-073K3L (YAGEO)"
R25 R38 R63 R66 R67 R68: library part Res2, "Resistor"
R69: library part RES2, "X7R/0402"
S1: library part SW-SPST, "Single-Pole, Single-Throw Switch"
U4: library part STM32F103
U5: library part SCT2230CTVBR
U6 U13: library part ACS724
U8: library part TLV1117-33IDCYR
U14: library part SN74LVC8T245PW
U16 U19: "SMD-8_L10.0-W6.5"
U17: library part GT24C512B-2UDLI-TR
U18: library part vrb2424s-10wr3_c5369853, "10W 宽压输入，隔离稳压单路,工作温度范围：-40℃ ~+ 85℃隔离电压：1500VDC2:1 超宽输入电压范围效率最高可达 88%具备输入欠压保护、输出短路保护、过流保护机制应用领域：电力、工控、通信、物联网、汽车等"
VT1 VT3: library part NPN, "NPN Transistor"
X1 X2 X3 X4 X5 X6 X7: library part CON1, "https://item.taobao.com/item.htm?spm=a1z09.2.0.0.28292e8dsDHJ66&id=616436650412&_u=f1hghf6m80e1"
Y1: library part 8MHz

## Free pads (board coordinates)
  round 137.8 hole 86.61: 0(2485.63,545) 1(2686,545) 2(3325,545) 3(3525.49,545) 4(3379.11,1224.63) 5(2831,1225.52) 6(3377.61,1730.52)
  round 275.59 hole 137.8: 4(118.11,78.74) 4(118.11,1850.39) 4(3858.27,78.74) 4(3858.27,1850.39)

## Via types
v1: diameter 18.9, hole 9.84, Top Layer to Bottom Layer, tented both sides, 125 vias
v2: diameter 23.62, hole 11.81, Top Layer to Bottom Layer, 114 vias
v3: diameter 18, hole 9.84, Top Layer to Bottom Layer, tented both sides, 2 vias

## Nets (pads, with @x,y where several pads share a name; then routed paths per layer and width w, separated by ;. In a path a pad name is that pad's centre, name@x,y a point inside that pad or via, vN(x,y) a via of type N, cw(c..) or ccw(c..) an arc to the next point about the centre after c; other vN are vias at no path point)
24V+: C48.2 C79.1 C80.2 R23.1 U7.2 U18.2 VD5.2 | length 1275.2
  Top Layer w20: C80.2@2385.67,942.81 2402.92,942.81 ; U7.2@2402.92,1026.02 2402.92,942.81 ; R23.1@2423.23,942.81 2402.92,942.81
  Top Layer w60: U18.2@1912,135 2037,135 2058,156 2058,822 ; 2058,885 2058,822 ; VD5.2@2246.77,822 2058,822
  Bottom Layer w20: U18.2@1912,135 1973,135 1979,129 C48.2@1979,116.5
CS: P2.1 U4.25 | length 1614.9
  Top Layer w8: P2.1@27,440 112,525 112,676 153,717 153,1093 166,1106 603,1106 650.27,1153.27 v1@650.27,1290.73 ; v1@648.73,1453.27 U4.25@733.71,1453.27
  Bottom Layer w8: v1@651.27,1290.73 v1@651.27,1455.73
  other v1: 652.27,1290.73 651.27,1458
DC: P2.2 U4.32 | length 1380.1
  Top Layer w8: P2.2@27,540 94.5,607.5 94.5,683.5 137,726 137,1105 152,1120 593,1120 631,1158 631,1282.5 630.82,1282.68 630.82,1303.82 642.47,1315.47 U4.32@733.71,1315.47
GH: C37.2 D21.2 J1.1 J1.3 R57.1 S1.1 | length 1145
  Top Layer w20: S1.1@2284,351 2284,660 2317,693 2500,693 2597.52,790.52 2597.52,880.52 J1.3@2641,880.52
  Bottom Layer w15: C37.2@2284,243.49 2284,282.57 2285,281.57 ; S1.1@2285,352 2285,281.57 ; R57.1@2368,256.63 2288.63,256.63 2285,260.26 2285,281.57
  Bottom Layer w20: 2285,260.26 2285,242.49 C37.2@2286.99,240.49 ; S1.1@2285,352 D21.2@2285,449.61
GL: J4.1 J4.3 R38.1 | length 323
  Top Layer w15: J4.1@3531,1160.52 J4.3@3581,1160.52 3608,1160.52 3616,1168.52 3616,1390.62 R38.1@3607.12,1399.5
GND: C1.1 C2.2 C4.1 C6.1 C7.1 C9.2 C13.1 C15.2 C16.1 C17.2 C18.2 C21.2 C23.2 C24.2 C25.2 C26.1 C27.2 C28.2 C29.2 C31.2 C32.2 C33.2 C34.2 C35.2 C36.2 C37.1 C38.2 C39.1 C40.2 C41.2 C42.2 C43.2 C44.2 C45.2 C46.1 C47.1 C48.1 C49.1 C51.1 C53.1 C67.2 C76.2 C77.2 C79.2 C80.1 C90.2 C109.2 C133.2 C134.2 C160.1 D9.15 D12.1 D16.1 D23.2 D32.3 J4.2 J4.4 P1.6 P2.7 P3.3 P7.3 pad.0 R3.2 R5.2 R8.1 R9.1 R13.1 R14.1 R15.1 R16.1 R17.1 R18.1 R20.1 R24.2 R25.2 R27.1 R28.1 R31.1 R33.1 R35.1 R37.2 R41.1 R43.1 R46.1 R49.1 R53.1 R56.1 R58.2 R59.1 R61.1 R65.1 R69.1 R118.2 R132.2 U1.4 U2.4 U3.3 U3.5 U4.8 U4.23 U4.35 U4.47 U5.1 U6.5 U7.1 U7.9 U8.1 U13.3 U13.4 U13.5 U14.8 U14.9 U14.10 U14.11 U14.12 U14.13 U14.22 U17.4 U17.9 U18.1 VT1.2 VT3.2 X1.1 Y1.2 Y1.4 | length 11902.6
  Top Layer w8: R118.2@455.98,1518.88 v1(455.98,1541.02) ; U4.23@814.42,1514.29 814.42,1471.58 v1(816,1470) ; v1(943.47,1374.53) U4.8@1072.29,1374.53 ; v1@979,1266 979,1219 991.58,1206.42 U4.47@991.58,1175.71
  Top Layer w10: C45.2@439.99,1344.51 501.5,1344.51 U17.9@513.99,1357 ; R132.2@532.88,1249.02 544,1260.14 U17.4@544,1297 ; U4.35@733.71,1256.42 v1@779.42,1256.42
  Top Layer w15: R31.1@269.12,905.98 v1@269.12,934.88 ; v1@741.51,1670.51 C134.2@770.99,1670.51 ; C90.2@1031.93,1888.08 1014.43,1870.58 1014.43,1836.08 1024.85,1825.66 D9.15@1066,1825.66 ; Y1.2@1186.31,1276.64 1185.74,1276.08 1185.74,1227 1199.49,1213.26 C27.2@1202.81,1213.26 ; R65.1@1224.5,1030 1313,1030 ; C28.2@1233.81,1428.26 1253.24,1408.83 Y1.4@1253.24,1363.26 1258.5,1358 v1(1293,1358) ; C2.2@1268.04,1928.19 1291.91,1928.19 v3@1292.02,1928.08 ; v1(1392.81,1828.19) U14.22@1448.4,1828.19 ; v1(1397.12,1597.88) U14.13@1448.4,1597.88 ; R61.1@1606.5,1029 1695,1029
  Top Layer w20: v1(1391.19,1928.19) C109.2@1415.89,1928.19 ; C51.1@1763,1630.5 1763,1675.06 v1(1783.06,1675.06) C76.2@1928,1675.06 1937.94,1675.06 2003.07,1609.93 U5.1@2070.84,1609.93 ; v1(2110.95,1816.95) R5.2@2110.95,1790.77 R37.2@2151.78,1790.77 ; C53.1@2233,1756.5 2234,1755.5 C16.1@2234,1715.5 ; C80.1@2350.49,942.99 U7.1@2350.49,1011.59 ; U7.1@2352.92,1026.02 2352.92,1091.92 v1@2368,1107 ; C6.1@2501.74,1325.61 v1(2521.39,1325.61) ; U2.4@2710.8,1658.24 v2(2710.8,1711.8) ; R8.1@2761,1774.5 C7.1@2861,1774.5 ; U1.4@2919.8,1658.24 v2(2919.8,1711.8) ; R13.1@2970,1774.5 C4.1@3069,1774.5 ; R25.2@3171.12,1447.5 3171.12,1409.88 3183.68,1397.32 U3.3@3275.76,1397.32 ; v2(3215.49,1398) U3.3@3239,1398 ; U6.5@3464.46,805.66 v2(3528.03,805.66) 3540.2,817.83 C17.2@3540.2,856.96 ; v2(3472.68,1973.2) C39.1@3498.54,1973.2 ; v2(3495.76,1318.47) U3.5@3495.76,1344.32 ; C13.1@3575.2,954.58 v2(3575.2,980.43) ; C40.2@3599.15,1938.2 3638.28,1938.2 v2(3650.45,1926.03) U13.5@3650.45,1862.46 ; v2(3607.51,1470.51) C160.1@3607.51,1498.01
  Top Layer w30: C77.2@2168,1327 2237,1396 C15.2@2237,1473.94
  Top Layer w40: 1707.21,1189.3 1707.21,1260.3 ; 1732.21,1188.3 1732.21,1259.3 ; C79.2@2069,1056.8 2069,1112 2096,1139 U7.9@2398,1139 ; C77.2@2173,1327 2173,1205.06 2173.06,1205 D12.1@2263,1205 ; D12.1@2261,1205 2261,1134 U7.9@2409,1134
  Top Layer w100: X1.1@2481.1,545 2481.1,48.9 2542,-12 3546,-12 3635,77 3635,255 3704,324 3858,324 3914.43,380.43 C24.2@3914.43,475 C25.2@3914.43,876 3914.43,1485.57 3832,1568 ; X1.1@2485.63,545 X1.1@2485.63,545.79 ; U13.4@3649,1620 3649,1594 3675,1568 3832,1568 ; 3668,1655 3745,1655 3832,1568
  Bottom Layer w8: C67.2@753,1483.5 802.5,1483.5 v1(816,1470) ; R3.2@928.02,1267.5 C33.2@1062,1267.5
  Bottom Layer w15: R28.1@227.12,906.02 260.02,906.02 268,914 v1@268,936 ; R33.1@352.88,906.02 v1(380.98,906.02) ; C34.2@780.5,1236 v1(780.5,1257.5) ; C32.2@1014.5,1389 1084,1389 1098.07,1374.93 C29.2@1098.07,1354.08 v1@1289.08,1354.08
  Bottom Layer w20: R20.1@1247.5,1709 R18.1@1247.5,1746 R16.1@1247.5,1820 R59.1@1247.5,1857.39 v1(1276.61,1857.39) ; U18.1@1912,35 1956,35 1979,58 C48.1@1979,81.5 ; C37.1@2286.99,197.01 2286.99,184.01 2297.63,173.37 R58.2@2368,173.37 ; C49.1@2825.81,1618.02 C1.1@2887.23,1618.02 2887.23,1701.23 2897.7,1711.7 2919.7,1711.7 v2(2919.8,1711.8)
  Bottom Layer w100: pad.0@2481.1,536 2481.1,46.9 2540,-12 3362,-12 ; C9.2@2870,907 2870,983 2925,1038 3862,1038 3914.43,985.57 C24.2@3914.43,475
  other v1: 268,940 922,1079 2369,1108 2398,1108 2427,1108 2456,1108 2485,1108 2369,1137 2398,1137 2427,1137 2456,1137 2485,1137 1064,1161 2369,1166 2398,1166 2427,1166 2456,1166 2485,1166 1275.12,1168 1692.02,1168.03 1721.02,1168.03 58,1191 1692.02,1197.03 1721.02,1197.03 1692.02,1226.03 1721.02,1226.03 1397.12,1232.24 1187,1235 347,1249 1692.02,1255.03 1721.02,1255.03 978,1267 545,1269 1692.02,1284.03 1721.02,1284.03 499,1337 530,1337 929,1340 1397.12,1354.12 347,1370.88 499,1376 530,1376 817,1402 1153.36,1476 1275.24,1476 1397.12,1476 310,1549 253,1586 898.12,1597 1020,1597 1158,1628 1271,1628 1881,1660 741.64,1670.37 1760.06,1675.06 1881,1683 444.12,1704 566,1704 1968,1753 1659.12,1754 447,1799 568.88,1799 890.12,1929 1012,1929
  other v2: 3198,-29 3233,-29 3268,-29 3303,-29 3338,-29 3198,2 3233,2 3268,2 3303,2 3338,2 2447,142 2482,142 2517,142 2447,173 2482,173 2517,173 2834.1,942.33 2869.1,942.33 2904.1,942.33 2834.1,973.33 2869.1,973.33 2904.1,973.33 2835,1774.5 3043,1774.5
  other v3: 1015,1849 1291.61,1928.49
HIN_U: R9.2 U1.2 U14.20 | length 341.3
  Top Layer w10: U14.20@1448.4,1777.01 1501.38,1777.01 1648.37,1924 ; U1.2@3019.8,1658.24 R9.2@3019.8,1738.7
  other v2: 3019.8,1711.8
HIN_V: R15.2 U2.2 U14.18 | length 370.8
  Top Layer w10: U14.18@1448.4,1725.83 1505.2,1725.83 1670.37,1891 ; U2.2@2810.8,1658.24 R15.2@2810.8,1738.7
  other v2: 2810.8,1711.8
IN1: P4.8 R22.2 | length 367
  Bottom Layer w15: R22.2@207.21,343.34 207.21,321.79 400,129 P4.8@472.82,129
IN2: P4.7 R30.2 | length 518.4
  Top Layer w15: R30.2@205.79,343.34 205.79,321.21 455,72 535,72 551.56,88.56 P4.7@551.56,129
IN3: P4.6 R32.2 | length 430.7
  Bottom Layer w15: R32.2@340.21,343.34 340.21,254.79 414,181 578.3,181 P4.6@630.3,129
IN4: P4.5 R34.2 | length 515.5
  Top Layer w15: R34.2@339.79,343.34 339.79,257.21 416,181 669,181 709.04,140.96 P4.5@709.04,129
IN5: P4.4 R40.2 | length 442.5
  Bottom Layer w15: R40.2@467.21,343.34 467.21,286.79 544,210 706.78,210 P4.4@787.78,129
IN6: P4.3 R42.2 | length 522.1
  Top Layer w15: R42.2@467.79,343.34 467.79,284.21 544,208 787.52,208 P4.3@866.52,129
IN7: P5.6 U16.3
IN7_1: R44.2 U16.2 | length 1351.7
  Top Layer w15: U16.2@1465,816.02 1477.98,816.02 v2(1509,785)
  Bottom Layer w15: R44.2@591.8,343.34 591.8,309.2 639,262 1073,262 1131,320 1131,505 1411,785 v2@1508,785
IN7_2: R45.2 U16.4 | length 1245.2
  Top Layer w15: R45.2@591.79,343.34 591.79,309.21 641,260 1051,260 1343,552 v2(1464,552) ; U16.4@1465,642.79 v2@1519.21,642.79
  Bottom Layer w15: v2(1464,552) 1464,635 1471,642 v2(1520,642) v2@1521,643
IN8: P5.5 U16.6
IN8_1: R47.2 U16.7 | length 1398.7
  Top Layer w15: v2(1694.02,816.02) U16.7@1749.86,816.02
  Bottom Layer w15: R47.2@720.8,343.34 720.8,305.2 735,291 1051,291 1097,337 1097,521 1393,817 v2@1694,817
IN8_2: R48.2 U16.5 | length 1220.8
  Top Layer w15: R48.2@720.79,343.34 720.79,303.21 734,290 1029,290 1321,582 1521,582 1581.79,642.79 U16.5@1749.86,642.79
IN9: P5.4 U19.3
IN10: P5.3 U19.6
IN10_1: R54.2 U19.7 | length 782.2
  Top Layer w15: v2(1320.98,817.02) U19.7@1374.86,817.02
  Bottom Layer w15: R54.2@966.21,343.34 1032.34,343.34 1067,378 1067,679 1205,817 v2@1322,817
IN10_2: R55.2 U19.5 | length 531.5
  Top Layer w15: R55.2@967.79,343.34 1027.34,343.34 1327.79,643.79 U19.5@1374.86,643.79
IN_1: D4.3 R28.2 U4.38 | length 917
  Top Layer w8: v1(190,940) 190,1061 221,1092 784,1092 814.42,1122.42 U4.38@814.42,1175.71
  Bottom Layer w8: D4.3@190,847.19 v1(190,940)
IN_2: D5.3 R31.2 U4.39 | length 902.7
  Top Layer w8: D5.3@232.81,840 232.81,1063.81 247,1078 789.8,1078 834.1,1122.3 U4.39@834.1,1175.71
IN_3: D6.3 R33.2 U4.40 | length 819.8
  Top Layer w8: v1@311,936.55 v1@313,934.55 ; v1@311,940 311,1024 351,1064 801,1064 853.79,1116.79 U4.40@853.79,1175.71
  Bottom Layer w8: D6.3@311.19,840 v1@311.19,932.81
  other v1: 311.19,940